# Altium PCB IvcBoard.PcbDoc (part 3 of 3)
Units mil, origin at the board's own origin, x right, y up, seen from the top; angles counter-clockwise.
Board outline 2900 x 5000 mil, 4 copper layers (Top Layer, GND 3, GND 2, Bottom Layer), stack 53.912 mil thick; 217 components, 141 nets, 662 pads, 224 vias.
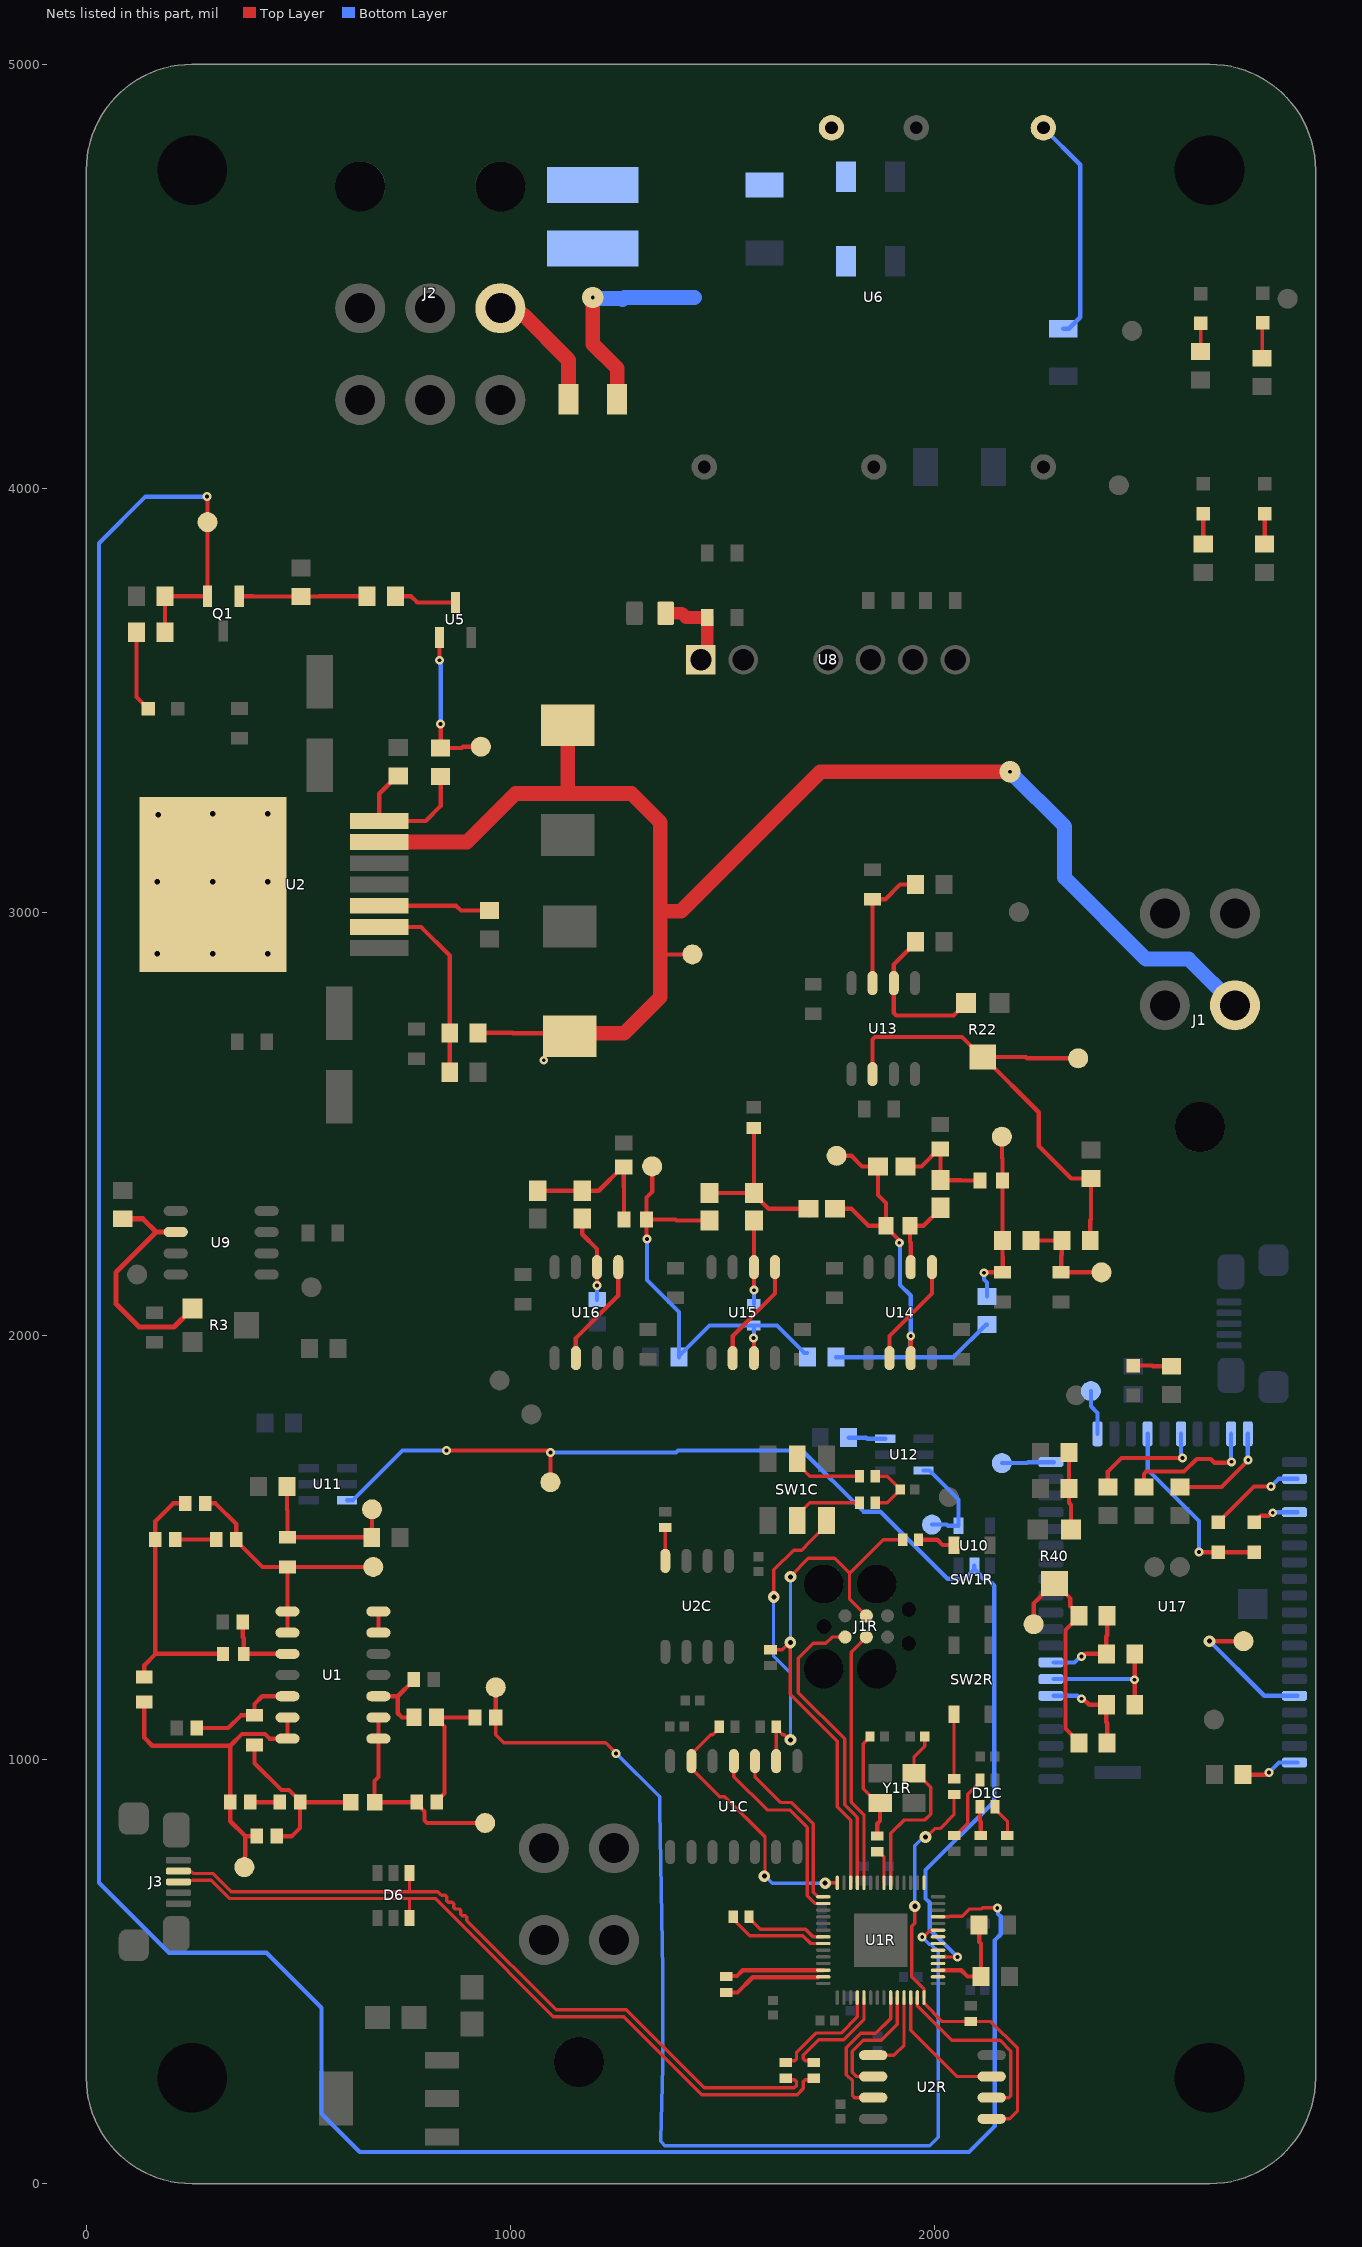
[diagram p5: the nets of this part, all layers, seen from the top]

## Via types
v1: diameter 21, hole 9, Top Layer to Bottom Layer, tented both sides, 102 vias
v2: diameter 20, hole 8, Top Layer to Bottom Layer, tented both sides, 41 vias
v3: diameter 27.56, hole 11.81, Top Layer to Bottom Layer, tented both sides, 34 vias
v4: diameter 30, hole 12, Top Layer to Bottom Layer, tented both sides, 11 vias
v5: diameter 45.28, hole 27.56, Top Layer to Bottom Layer, tented both sides, 10 vias
v6: diameter 31.5, hole 15.75, Top Layer to Bottom Layer, tented both sides, 9 vias
v7: diameter 50, hole 13, Top Layer to Bottom Layer, 9 vias
v8: diameter 50, hole 9, Top Layer to Bottom Layer, tented both sides, 7 vias
v9: diameter 31.5/31.5/31.5/31.5 (per signal layer), hole 15.75, Top Layer to Bottom Layer, tented both sides, 1 vias

## Nets (pads, with @x,y where several pads share a name; then routed paths per layer and width w, separated by ;. In a path a pad name is that pad's centre, name@x,y a point inside that pad or via, vN(x,y) a via of type N, cw(c..) or ccw(c..) an arc to the next point about the centre after c; other vN are vias at no path point) (continued)
MOSI_RP2CAN: U1C.11 U1R.30 | length 466.1
  Top Layer w7.87: U1C.11@1527.56,996.85 1527.56,960.44 1606.31,881.69 1659.96,881.69 1701.18,840.48 1701.18,678.91 1718.87,661.22 U1R.30@1738.68,661.22
nCS_RP2CAN: R4C.2 U1C.13 U1R.28 | length 642
  Top Layer w7.87: R4C.2@1493.11,1078.54 1493.11,1074.61 1477.5,1059 1472.98,1059 1427.56,1013.58 1427.56,980.12 1494.75,912.93 1506.45,912.93 1601.18,818.2 1601.18,726.97 v3(1599.63,725.41) ; v3(1743,709) 1743.94,709.94 U1R.28@1771.65,709.94
  Bottom Layer w7.87: v3(1599.63,725.41) 1601.92,725.41 1618.87,708.46 1742.46,708.46 v3(1743,709)
NetC1_1: C1.1 R5.2 R6.1 | length 305.7
  Top Layer w10: C1.1@826.62,900 826.62,902.95 845,921.33 845,1078.62 826.57,1097.05 R6.1@826.57,1100 R5.2@917,1100
NetC1_2: C1.2 R1.2 TP1.TP U1.1 U1.2 | length 497.3
  Top Layer w10: U1.2@689.28,1100 U1.1@689.28,1050 689.28,959.28 680.17,950.17 R1.2@680.17,900 776.43,900 798,878.43 798,856.86 803.86,851 TP1.TP@940.81,851
NetC2_1: C2.1 C3.1 R4.1 TP2.TP U1.13 U1.14 | length 812.7
  Top Layer w10: R4.1@137,1136.47 137,1052 155.73,1033.27 339.76,1033.27 ; TP2.TP@373,759 373,770.62 375,772.62 375,820 ; C2.1@402,820 375,820 ; U1.13@474.72,1100 U1.14@474.72,1050 432.56,1050 421.56,1061 367.49,1061 339.76,1033.27 ; 339.76,1033.27 C3.1@339.76,900 339.76,855.24 375,820
NetC2_2: C2.2 C4.2 R1.1 R7.1 | length 433.4
  Top Layer w10: R7.1@397,1035 397,992 460.28,928.72 478.48,928.72 494.48,912.72 504.24,902.95 C4.2@504.24,900 ; C2.2@449.24,820 485,820 504.24,839.24 C4.2@504.24,900 ; R1.1@623.83,900 C4.2@504.24,900
NetC2C_2: C2C.2 R2C.2 R3C.2 | length 144.3
  Top Layer w7.87: R2C.2@1861.22,1606.1 1889.17,1606.1 1919.88,1636.81 C2C.2@1919.88,1637.6 1919.88,1638.39 1889.17,1669.09 R3C.2@1861.22,1669.09
NetC2R_1: C2R.1 R1R.2 Y1R.3 | length 263.4
  Top Layer w8: C2R.1@1849.02,1054.92 1849.02,1054.13 1833.32,1038.44 1833.32,931.83 1866.85,898.31 Y1R.3@1872.76,898.31
  Top Layer w10: R1R.2@1866.14,820.59 1866.14,849.14 1872.76,855.76 Y1R.3@1872.76,898.31
NetC3_2: C3.2 C4.1 | length 70
  Top Layer w10: C3.2@387,900 C4.1@457,900
NetC5_1: C5.1 R6.2 U1.3 | length 183.6
  Top Layer w10: U1.3@689.28,1150 734.95,1150 ; C5.1@772,1190 772,1187.05 734.95,1150 ; R6.2@773.43,1100 745,1100 734.95,1110.05 734.95,1150
NetC6_1: C6.1 R7.2 U1.12 | length 261
  Top Layer w10: C6.1@260.62,1075 335,1075 365,1105 R7.2@397,1105 397,1132 415,1150 U1.12@474.72,1150
NetC7_1: C7.1 R8.1 U1.10 | length 179.1
  Top Layer w10: C7.1@369.24,1325 369.24,1289.76 371.61,1287.39 R8.1@371.61,1250 U1.10@474.72,1250
NetC10_1: C10.1 C11.1 C13.2 TP6.TP U1.8 U1.9 | length 627.5
  Top Layer w10: C10.1@280.23,1605.09 304.91,1605.09 353.85,1556.15 C11.1@353.85,1520.09 C11.1@355,1521.24 ; C11.1@358,1512.99 415.85,1455.14 ; 416,1455 C13.2@475,1455 475,1381.57 474.72,1381.28 U1.8@474.72,1350 U1.9@474.72,1300 ; C13.2@477,1455 TP6.TP@677,1455
NetC10_2: C10.2 C12.2 R4.2 R8.2 | length 623.8
  Top Layer w10: R4.2@137,1195.53 137,1223 163.5,1249.5 ; 162.98,1250.02 C12.2@162.98,1520.09 162.98,1562.98 205.09,1605.09 C10.2@232.98,1605.09 ; 164,1250 R8.2@322.39,1250
NetC11_2: C11.2 C12.1 | length 96.4
  Top Layer w10: C12.1@210.23,1520.09 C11.2@306.61,1520.09
NetC13_1: C13.1 R12.1 SB1.2 TP7.TP | length 385.3
  Top Layer w10: SB1.2@473.5,1645 473.5,1589.5 475,1588 C13.1@475,1525 R12.1@673.5,1525 673.5,1547.5 674,1548 TP7.TP@674,1591
NetC25_1: C25.1 R24.1 U13.3 | length 312.2
  Top Layer w10: U13.3@1855,2832.28 C25.1@1855,3030 1885,3030 1920,3065 R24.1@1955,3065
NetC27_1: C27.1 C33.1 R31.2 R33.2 | length 260.8
  Top Layer w10: C27.1@1932.51,2400 1970.59,2400 2012.05,2441.46 R33.2@2015,2441.46 ; R33.2@2015,2435 C33.1@2015,2367.51 2062.49,2367.51 2063,2367 R31.2@2108.43,2367
NetC27_2: C27.2 R25.2 R30.1 SB9.1 SB10.2 TP25.TP U14.7 | length 1159.6
  Top Layer w10: R30.1@1766.54,2300 1805,2300 1845,2260 R25.2@1886.46,2260 ; TP25.TP@1770,2425 1805,2425 1830,2400 C27.2@1867.49,2400 1867.49,2332.51 1886.46,2313.54 R25.2@1886.46,2260 ; v1(1918.09,2219.91) 1915.99,2222.02 1915.99,2227.52 1886.46,2257.05 R25.2@1886.46,2260 ; U14.7@1945,1955 v1(1945,2000)
  Bottom Layer w10: SB10.2@1768.5,1950 1945,1950 ; v1(1918.09,2219.91) 1919.5,2218.5 1919.5,2120.5 1945,2095 v1(1945,2000) 1945,1950 ; SB9.1@2125,2026.5 2122.5,2026.5 2046,1950 1945,1950
NetC28_1: C28.1 C34.1 R30.2 R35.2 | length 447.8
  Top Layer w10: C28.1@1470,2337.51 C34.1@1575,2337.51 ; R35.2@1575,2490.77 C34.1@1575,2337.51 ; R30.2@1685.55,2290 R30.2@1705,2290 ; R30.2@1687.7,2302.3 R30.2@1705,2285 ; R30.2@1703.46,2300 1609.79,2300 1575,2334.79 C34.1@1575,2337.51
NetC28_2: C28.2 R26.2 R32.1 SB10.1 SB11.2 TP26.TP U15.7 | length 1071.6
  Top Layer w10: v1@1320,2230 1321.57,2231.57 R32.1@1321.57,2275 ; TP26.TP@1335,2400 1335,2340 1321.57,2326.57 R32.1@1321.57,2275 ; C28.2@1470,2272.49 1392.51,2272.49 1390,2275 R32.1@1321.57,2275 ; U15.7@1575,1947.72 v1@1575,1995
  Bottom Layer w10: v1(1323,2229) 1323,2132 1398.5,2056.5 SB11.2@1398.5,1950 ; SB11.2@1398.5,1952.5 1470.41,2024.41 R26.2@1575,2024.41 ; v1@1575,1994 R26.2@1575,2024.41 ; SB10.1@1700,1960 1694,1960 1629.59,2024.41 R26.2@1575,2024.41
  other v1: 1574,1995
NetC29_1: C29.1 C35.1 R32.2 R34.2 | length 329.8
  Top Layer w10: C29.1@1085,2342.51 C35.1@1170,2342.51 1209.1,2342.51 1265.05,2398.46 R34.2@1268,2398.46 1268,2352 1268.43,2351.57 R32.2@1268.43,2275
NetC33_2: C33.2 R25.1 U14.2 | length 189
  Top Layer w10: U14.2@1945,2162.28 1945,2220 1943.54,2221.46 R25.1@1943.54,2260 1975.24,2260 2015,2299.76 C33.2@2015,2302.49
NetC34_2: C34.2 R26.1 U15.2 | length 195.3
  Top Layer w10: v1@1574,2109 1575,2110 U15.2@1575,2162.28 C34.2@1575,2272.49
  Bottom Layer w10: R26.1@1575,2075.59 v1@1575,2107
  other v1: 1575,2108
NetC35_2: C35.2 R27.1 U16.2 | length 204.4
  Top Layer w10: C35.2@1170,2277.49 1170,2240 1205,2205 U16.2@1205,2162.28 v1(1205,2119)
  Bottom Layer w10: R27.1@1205,2085.54 v1@1205,2117
NetC36_1: C36.1 R28.1 R29.2 TP19.TP | length 243.6
  Top Layer w10: R29.2@2228.5,2225 R28.1@2301.5,2225 2301.5,2191.5 2300,2190 C36.1@2300,2150 TP19.TP@2395,2150
NetC37_1: C37.1 R29.1 R31.1 SB9.2 TP20.TP | length 419.1
  Top Layer w10: v1@2120,2150 C37.1@2160,2150 ; TP20.TP@2160,2470 2160,2420 2161.57,2418.43 2161.57,2247.57 2161.5,2247.5 R29.1@2161.5,2225 2161.5,2187.5 2162,2187 C37.1@2162,2150
  Bottom Layer w10: v1@2120,2148 2118.03,2146.03 2118.03,2132.97 2125,2126 SB9.2@2125,2093.5
  other v1: 2118,2149
NetC41_1: C41.1 F1.2 L1.1 | length 510
  Top Layer w10: v8@1195,4445 v8@1200,4450
  Top Layer w35: v8@1195,4445 1195,4340 1252.48,4282.52 F1.2@1252.48,4210
  Bottom Layer w35: v8(1195,4450) 1197.87,4447.13 1262.87,4447.13 1265,4445 1270,4450 1435,4450
NetC42_1: C42.1 C43.1 L1.2 U6.1
NetC45_1: C45.1 L3.2 U8.1 | length 208.5
  Top Layer w30: L3.2@1366.81,3705 1405,3705 1415,3695 C45.1@1465,3695 1465,3610 U8.1@1450,3595
NetD1_1: D1.1 R15.2 | length 191.4
  Top Layer w10: R15.2@118.5,3660 118.5,3507.5 D1.1@146,3480
NetD1C_1: D1C.1 R5C.2 | length 80.1
  Top Layer w7.87: D1C.1@2143.7,889.57 2143.7,884.65 2173.23,855.12 R5C.2@2173.23,821.65
NetD1C_2: D1C.2 R7C.2 | length 68.7
  Top Layer w10: D1C.2@2108.27,889.57 2108.27,855.73 2110.24,853.76 R7C.2@2110.24,821.65
NetD1C_3: D1C.3 R8C.2 | length 158.5
  Top Layer w7.87: R8C.2@2047.24,821.65 2051.18,821.65 2079.72,850.2 2079.72,919.09 2108.27,947.64 D1C.3@2108.27,952.56
NetD2_1: D2.1 R18.1 | length 71
  Top Layer w8: R18.1@2629,4318 R18.1@2629,4322.5 D2.1@2629,4389
NetD3_1: D3.1 R20.1 | length 67.1
  Top Layer w10: R20.1@2630,3875 2635,3880 D3.1@2635,3940
NetD4_2: D4.2 R17.1 | length 69
  Top Layer w8: R17.1@2774,4308 D4.2@2774,4377
NetD5_2: D5.2 R19.1 | length 65
  Top Layer w10: R19.1@2780,3875 D5.2@2780,3940
NetD7_2: D7.2 R36.1 | length 90.6
  Top Layer w10: D7.2@2470,1930 2515,1930 2516.5,1928.5 R36.1@2560,1928.5
NetD8_1: D8.1 D9.1 U17.24 | length 459.4
  Top Layer w10: v1(2625,1490) D8.1@2670,1490 D9.1@2755,1490
  Bottom Layer w10: U17.24@2503.87,1769.21 2503.87,1684.57 2625,1563.44 v1(2625,1490)
NetD8_2: D8.2 U17.32 | length 230
  Top Layer w10: D8.2@2670,1560 2755,1645 v1(2795,1645)
  Bottom Layer w10: v1(2795,1645) 2812.91,1662.91 U17.32@2857.32,1662.91
NetD9_2: D9.2 U17.34 | length 112.3
  Top Layer w10: D9.2@2755,1560 2771,1576 2789.02,1576 2796.02,1583 v1(2799,1583)
  Bottom Layer w10: v1(2799,1583) 2800.17,1584.17 U17.34@2857.32,1584.17
NetDNP1_1: DNP1.1 U1R.35 | length 198.4
  Top Layer w8: DNP1.1@1560,630 1589.76,600.24 1696.78,600.24 1714.47,582.54 1738.62,582.54 U1R.35@1738.68,582.48
NetDNP1_2: DNP1.2 U1R.36 | length 237.8
  Top Layer w8: DNP1.2@1525,625 1564.76,585.24 1690.56,585.24 1709.07,566.73 U1R.36@1738.68,566.73
NetDNP2_1: DNP2.1 U1R.40 | length 229.4
  Top Layer w10: DNP2.1@1515,490 1535,490 1548.74,503.74 U1R.40@1738.68,503.74
NetDNP2_2: DNP2.2 U1R.41 | length 231.3
  Top Layer w10: DNP2.2@1510,451.3 1536.3,451.3 1572.18,487.18 U1R.41@1726.46,487.18
NetQ1_1: Q1.1 R13.2 R14.1 | length 301.9
  Top Layer w10: Q1.1@361,3745 393,3745 393.5,3744.5 549.5,3744.5 550,3745 R14.1@662.5,3745
NetR2_1: R2.1 R3.1 U9.2 | length 567.3
  Top Layer w12: R2.1@86,2276.5 133.5,2276.5 165,2245 ; U9.2@211,2245 197.95,2245 165,2245 ; R3.1@250.13,2064.37 206.76,2021 125,2021 70,2076 70,2150 165,2245
NetR2C_1: R2C.1 SW1C.2 | length 170.8
  Top Layer w7.87: SW1C.2@1677.17,1564.76 1677.17,1576.57 1706.69,1606.1 1722.17,1606.1 1722.26,1606.2 1769.86,1606.2 1769.96,1606.1 R2C.1@1823.82,1606.1
NetR3C_1: R3C.1 SW1C.5 | length 170.8
  Top Layer w7.87: SW1C.5@1677.17,1710.43 1677.17,1698.62 1706.69,1669.09 1722.17,1669.09 1722.26,1669 1769.86,1669 1769.96,1669.09 R3C.1@1823.82,1669.09
NetR6C_1: R6C.1 U2C.8 | length 78.7
  Top Layer w7.87: U2C.8@1365.94,1469.29 R6C.1@1365.94,1548.03
NetR6R_1: R6R.1 SW1R.A2 | length 105.4
  Top Layer w7.87: SW1R.A2@2038.39,1519.49 2047.24,1510.63 SW1R.A2@2047.24,1506.69
  Top Layer w10: R6R.1@1963.58,1519.49 2007.51,1519.49 2020.31,1506.69 SW1R.A2@2047.24,1506.69
NetR7R_1: R7R.1 SW2R.A1 | length 151.6
  Top Layer w7.87: R7R.1@2047.24,955.51 SW2R.A1@2047.24,1107.09
NetR9_1: R9.1 R10.2 U2.2 | length 421
  Top Layer w10: U2.2@740,2965 790,2965 857.5,2897.5 R10.2@857.5,2715 R9.1@857.5,2622
NetR14_2: R14.2 U5.3 | length 147.7
  Top Layer w10: R14.2@729.5,3745 766,3745 781,3730 U5.3@871,3730
NetR21_1: R21.1 SB5.2 U1R.3 | length 229.9
  Top Layer w10: U1R.3@2009.35,503.74 2064.26,503.74 2079,489 SB5.2@2110.5,489 2110.5,566.5 2106.5,570.5 R21.1@2106.5,610
NetR22_2: R22.2 R28.2 SB8.1 TP18.TP U13.6 | length 1138.6
  Top Layer w10: U13.6@1855,2617.72 1855,2699.14 1860.86,2705 2065.94,2705 2113.03,2657.91 2217.09,2657.91 2220,2655 TP18.TP@2340,2655 ; R22.2@2116.97,2657.91 2247,2527.88 2247,2448 2323.5,2371.5 SB8.1@2370,2371.5 ; R28.2@2368.5,2225 2368.5,2273.5 2370,2275 SB8.1@2370,2355
NetR22_3: R22.3 R23.1 U13.2 | length 374.9
  Top Layer w10: R23.1@1956.5,2930 1956.5,2927.5 1905,2876 U13.2@1905,2832.28 1905,2761.86 1910.86,2756 2045.76,2756 R22.3@2075.63,2785.87
NetR37_1: R37.1 R38.1 U17.6 | length 218
  Top Layer w10: v1@2350,1140 2351.9,1141.9 2354.1,1141.9 2366,1130 R38.1@2406.5,1130 2406.5,1088.5 2408.5,1086.5 R37.1@2408.5,1040
  Bottom Layer w10: U17.6@2282.52,1151.1 2337.92,1151.1 2344.02,1145 v1@2345,1145
  other v1: 2348,1144
NetR37_2: R37.2 R40.2 R41.2 TP28.TP | length 544.3
  Top Layer w10: TP28.TP@2235,1320 2235,1368.88 2247.48,1381.37 2282.03,1415.91 2285.97,1415.91 2321.5,1380.38 2321.5,1362.5 2341.5,1342.5 2341.5,1337.5 2326.5,1322.5 2310,1306 2310,1074 2341.5,1042.5 R37.2@2341.5,1040
NetR38_2: R38.2 R39.2 U17.7 | length 308.2
  Top Layer w10: R38.2@2473.5,1130 2473.5,1188.5 v1@2475,1190 ; v1@2473.5,1193.5 R39.2@2473.5,1250
  Bottom Layer w10: U17.7@2282.52,1190.47 2471.53,1190.47 v1(2473,1189)
NetR39_1: R39.1 R41.1 U17.8 | length 218.4
  Top Layer w10: v1@2350,1243.02 2356.98,1250 R39.1@2406.5,1250 2406.5,1291.5 2408.5,1293.5 R41.1@2408.5,1340
  Bottom Layer w10: U17.8@2282.52,1229.84 2331.05,1229.84 2343.01,1241.8 2343.2,1241.8 v1@2345,1240
  other v1: 2348,1244
NetR40_1: R40.1 R42.1 SB12.1 | length 183.2
  Top Layer w10: SB12.1@2318.5,1725 2318.5,1606.5 2323.37,1601.63 R40.1@2323.37,1543.87
NetSB2_1: SB2.1 U2.3 | length 264.8
  Top Layer w10: U2.3@691,3015 872.5,3015 884,3003.5 SB2.1@951,3003.5
NetSB3_1: SB3.1 SB4.1 U2.7 | length 356.1
  Top Layer w10: SB3.1@736,3321.5 733.5,3321.5 691,3279 U2.7@691,3215 801,3215 836,3250 SB4.1@836,3320
NetSB4_2: SB4.2 TP9.TP U5.1 | length 358.7
  Top Layer w10: v1(833,3594) 833.5,3594.5 U5.1@833.5,3648 ; v1(836,3444) SB4.2@836,3387 886,3387 889,3390 TP9.TP@931,3390
  Bottom Layer w10: v1(833,3594) 834.91,3592.09 834.91,3585.02 836,3583.93 v1(836,3444)
NetSB6_2: SB6.2 U12.6 | length 87.6
  Bottom Layer w10: SB6.2@1798.5,1760 1840,1760 1842.6,1757.4 U12.6@1885,1757.4
NetSB13_2: SB13.2 U17.49 | length 140.7
  Top Layer w10: SB13.2@2728.5,965 2782.02,965 2787.02,970 v1(2790,970)
  Bottom Layer w10: v1(2790,970) 2813.62,993.62 U17.49@2857.32,993.62
NetSB14_1: SB14.1 U17.26 | length 284
  Top Layer w10: SB14.1@2410,1643.5 2410,1680 2442.2,1712.2 v1(2585.8,1712.2)
  Bottom Layer w10: U17.26@2582.61,1769.21 2582.61,1718.37 2585.8,1715.18 v1(2585.8,1712.2)
NetSB15_1: SB15.1 U6.6 | length 534
  Bottom Layer w10: U6.6@2258,4850 2345,4763 2345,4403.31 2317.87,4376.18 SB15.1@2305,4376.18
NetSB16_1: SB16.1 U17.30 | length 250.5
  Top Layer w10: SB16.1@2580,1643.5 2678.5,1643.5 2741,1706 v1(2741,1707)
  Bottom Layer w10: U17.30@2740.09,1769.21 2740.09,1707.91 v1(2741,1707)
NetSB18_1: SB18.1 U17.29 | length 323.7
  Top Layer w10: SB18.1@2495,1643.5 2495,1674.14 2500.86,1680 2589.66,1680 2619.66,1710 2652.84,1710 2661.84,1701 2699.94,1701 v1(2701.97,1703.03)
  Bottom Layer w10: U17.29@2700.72,1769.21 2700.72,1704.28 v1(2701.97,1703.03)
NetTP14_TP: TP14.TP U10.4 U12.3 | length 236.5
  Bottom Layer w10: U12.3@1975,1682.6 1989,1682.6 2057.6,1614 U10.4@2057.6,1552.24 2032.76,1552.24 2030,1555 TP14.TP@1995,1555
NetTP21_TP: TP21.TP U17.20 | length 123.5
  Bottom Layer w10: TP21.TP@2160,1700 2220,1700 2222.28,1702.28 U17.20@2282.52,1702.28
NetTP22_TP: TP22.TP U17.21 | length 107.3
  Bottom Layer w10: TP22.TP@2370,1870 2370,1834 2385.76,1818.24 U17.21@2385.76,1769.21
NetTP23_TP: TP23.TP U17.45 | length 340.7
  Top Layer w10: v3(2650,1280) TP23.TP@2730,1280
  Bottom Layer w10: v3(2650,1280) 2778.9,1151.1 U17.45@2857.32,1151.1
NetU1_6: U1.6 U1.7 | length 50
  Top Layer w10: U1.6@689.28,1300 U1.7@689.28,1350
NetU1R_2: U1R.2
NetU1R_4: U1R.4
NetU1R_6: U1R.6
NetU1R_7: U1R.7
NetU1R_8: U1R.8
NetU1R_15: U1R.15
NetU14_1: U14.1 U14.6 | length 256
  Top Layer w10: U14.6@1895,1947.72 1895,2000 1995,2100 U14.1@1995,2162.28
NetU15_1: U15.1 U15.6 | length 256
  Top Layer w10: U15.6@1525,1947.72 1525,2000 1625,2100 U15.1@1625,2162.28
NetU16_1: U16.1 U16.6 | length 256
  Top Layer w10: U16.6@1155,1947.72 1155,1995 1255,2095 U16.1@1255,2162.28
OutputSelect: TP16.TP U1R.5 U10.2 U11.3 | length 2820.8
  Top Layer w8: U1R.5@2009.35,535.24 2026.57,535.24 ; 2026.81,535 v1@2055,535
  Top Layer w10: v1(850.13,1729.86) v1@1087.17,1729.86 ; TP16.TP@1095,1655 v1(1095,1725) ; 2026.57,535.24 2026.81,535
  Bottom Layer w10: U11.3@615,1612.6 629,1612.6 746.26,1729.86 v1(850.13,1729.86) ; v1(1095,1725) 1390.99,1725 1395.99,1730 1689,1730 1833.46,1585.54 1873.04,1585.54 2031.5,1427.07 2073.97,1427.07 2081.04,1434.14 2081.04,1435.92 U10.2@2095,1449.88 ; v1(2055.13,534.86) 1990,599.99 1990,663.05 1980,673.05 1980,740 2142,902 2142,1410.76 2125.76,1427 2116.11,1427 2109.59,1433.51 2109.59,1435.29 2106.81,1438.07 U10.2@2095,1449.88 ; U10.2@2095,1457.76 U10.2@2095,1449.88
QSPI_SCLK_RP2040: U1R.52 U2R.6 | length 294.7
  Top Layer w7.87: U2R.6@1852.36,253.15 1816.85,253.15 1807.09,262.91 1807.09,312.93 1832.54,338.39 1875.2,338.39 1913.39,376.57 U1R.52@1913.39,439.27
QSPI_SD0_RP2040: U1R.53 U2R.5 | length 194.8
  Top Layer w7.87: U2R.5@1856.36,303.15 1905.15,303.15 1929.13,327.13 U1R.53@1929.13,439.27
QSPI_SD1_RP2040: U1R.55 U2R.2 | length 436.8
  Top Layer w7.87: U1R.55@1960.63,439.27 1960.63,419.46 2041.71,338.39 2155.71,338.39 2181.16,312.93 2181.16,243.37 2181.1,243.31 2181.1,207.76 2176.49,203.15 U2R.2@2135.88,203.15
QSPI_SD2_RP2040: U1R.54 U2R.3 | length 313.4
  Top Layer w7.87: U1R.54@1944.88,439.27 1944.88,362.01 2053.74,253.15 U2R.3@2135.88,253.15
QSPI_SD3_RP2040: U1R.51 U2R.7 | length 348.4
  Top Layer w7.87: U2R.7@1852.36,203.15 1812.33,203.15 1807.72,207.76 1807.72,242.66 1793.21,257.17 1793.21,321.33 1826.51,354.63 1862.47,354.63 1897.64,389.79 U1R.51@1897.64,439.27
QSPI_SS_RP2040: R5R.2 R7R.2 U1R.56 U2R.1 | length 1028.1
  Top Layer w7.87: v3(1954.49,654.6) 1954.49,614.04 1947.52,607.08 1947.52,487.94 1976.38,459.08 U1R.56@1976.38,439.27 ; U1R.56@1976.38,425.98 2019.69,382.68 R5R.2@2086.61,382.68 2133.69,382.68 2196.91,319.46 2196.91,171.91 2178.15,153.15 U2R.1@2131.89,153.15 ; v3(1980,818) 1981.85,818 2001.81,837.95 2014.04,837.95 2047.24,871.16 R7R.2@2047.24,918.11
  Bottom Layer w7.87: v3(1954.49,654.6) 1954.49,797.16 1975.33,818 v3(1980,818)
Rp2040Sig: R5.1 TP3.TP U1R.9 | length 2573.6
  Top Layer w8: R5.1@966.21,1100 966.21,1058.79 985,1040 1225,1040 v1(1250,1015) ; v1(1971.96,581.96) 1974.42,581.96 1990.69,598.23 U1R.9@2009.35,598.23
  Top Layer w10: TP3.TP@966,1171 966,1135 966.21,1134.79 R5.1@966.21,1100
  Bottom Layer w8: v1(1250,1015) 1352.5,912.5 1352.5,884.32 1360,501.89 1360,276.83 1360,276.72 1355.16,103.26 1355.16,99.84 1357.5,97.5 1365,90 1990.31,90 2010,109.69 2010,548 1992.74,565.26 1988.66,565.26 v1(1971.96,581.96)
RUN_RP2040: J1R.4 R4R.2 R6R.2 U1R.26 | length 1282.4
  Top Layer w7.87: R4R.2@1614.17,1259.65 1642.16,1259.65 1659.52,1277 v3(1661,1277) 1661,1154.52 1771.65,1043.87 1771.65,888.95 1803.15,857.46 U1R.26@1803.15,709.94 ; v3(1661.42,1431.55) 1661.42,1432.87 1703.74,1475.2 1765.19,1475.2 1800.59,1439.8 ; J1R.4@1840.16,1339.76 1800.59,1379.33 1800.59,1439.8 ; R6R.2@1926.18,1519.49 1880.29,1519.49 1800.59,1439.8
  Bottom Layer w7.87: v3(1661,1277) 1661.21,1277.21 1661.21,1431.34 v3(1661.42,1431.55)
SCK_RP2CAN: U1C.10 U1R.29 | length 409.6
  Top Layer w7.87: U1C.10@1577.56,996.85 1577.56,960.44 1638.77,899.23 1664.7,899.23 1715.28,848.64 1715.28,687.08 1725.39,676.97 U1R.29@1738.68,676.97
SWCLK_RP2040: J1R.3 U1R.24 | length 606.9
  Top Layer w7.87: U1R.24@1834.65,709.94 1834.65,870.5 1804.72,900.43 1804.72,1254.33 J1R.3@1840.16,1289.76
SWDIO_RP2040: J1R.1 U1R.25 | length 718.6
  Top Layer w7.87: J1R.1@1790.16,1289.76 1759.62,1289.76 1745.05,1275.2 1715.12,1275.2 1679.72,1239.8 1679.72,1158.55 1788.97,1049.3 1788.97,893.9 1818.9,863.98 U1R.25@1818.9,709.94
TempShtdwnState: Q1.2 R15.1 R16.1 TP10.TP U1R.11 | length 7096.7
  Top Layer w8: U1R.11@2009.35,629.72 2036.44,629.72 2037.49,630.78 2066.44,630.78 2083.84,648.18 2112.29,648.18 2114.83,650.72 v1(2149.28,650.72)
  Top Layer w10: R15.1@185.5,3660 185.5,3699.5 186,3700 R16.1@186,3745 Q1.2@286,3745 TP10.TP@286,3920 286,3979 v1(285,3980)
  Bottom Layer w10: v1@280,3980 140,3980 30,3870 30,710 195,545 425,545 555,415 555,165 645,75 2082.37,75 2143.38,136.01 2143.38,574.59 2157.26,588.48 2157.26,630.34 2151.11,636.49 2151.11,648.89 v1(2149.28,650.72)
TERM_DET_RP2CAN: R1C.2 SW1C.3 U1C.9 | length 724.1
  Top Layer w7.87: v3(1622,1384) 1622,1448.07 1668.63,1494.69 1687.69,1494.69 1706.98,1513.98 1707.09,1513.98 1746.06,1552.95 SW1C.3@1746.06,1564.76 ; U1C.9@1627.56,996.85 R1C.2@1627.56,1074.61 ; R1C.2@1627.56,1078.54 R1C.2@1627.56,1074.61 ; v3(1661.42,1047.05) 1658.92,1047.05 1646.96,1059 1643.17,1059 R1C.2@1627.56,1074.61
  Bottom Layer w7.87: v3(1622,1384) 1621.42,1383.42 1621.42,1244.53 1661.42,1204.53 v3(1661.42,1047.05)
TH: U2.8 | length 120.2
  Top Layer w10: U2.8@214.27,3150 U2.8@299.27,3065
  other v7: 168,2902 298,2902 428,2902 168,3072 298,3072 428,3072 170,3230 298,3232 428,3232
TransducerOut: J1.1 R10.1 TP8.TP U2.6 U3.1 U4.2 | length 3640.5
  Top Layer w10: R10.1@924.5,2715 1006,2715 1007,2714 U4.2@1141,2714 ; 1354,2900 TP8.TP@1430,2900
  Top Layer w35: U2.6@691,3165 897.95,3165 1012.95,3280 1136,3280 ; U3.1@1136,3435 1136,3280 ; U4.2@1141,2714 1269,2714 1354,2799 1354,2900 1354,3002 ; v8(2179,3331) 1732,3331 1403,3002 1354,3002 ; 1136,3280 1286,3280 1354,3212 1354,3002
  Bottom Layer w10: J1.1@2708,2778 J1.1@2708,2782
  Bottom Layer w35: v8(2179,3331) 2308,3202 2308,3081 2500,2889 2601,2889 J1.1@2708,2782
  other v2: 1079.45,2650.61
USB_N: D6.1 J3.2 R3R.1 | length 1775.1
  Top Layer w8: J3.2@217.32,737.59 246.78,737.22 252.06,731.94 298.58,731.94 305.61,724.91 341.52,689 760,689 ; D6.1@762.4,733.15 762.4,691.4 760,689 ; R3R.1@1650.53,248.82 1654.42,244.92 1670.84,244.92 1675.53,240.23 1675.53,231.26 1670.26,225.99 1458.28,225.99 1274.27,410 1108.63,410 900.38,618.25 897.55,621.08 897.55,628.45 894.01,631.99 886.64,631.99 883.1,635.52 883.1,644.62 879.57,648.15 870.48,648.15 866.94,651.69 866.94,660.78 863.4,664.31 854.31,664.31 850.78,667.85 850.78,676.94 847.24,680.48 838.15,680.48 835.32,683.31 829.63,689 760,689
USB_P: D6.6 J3.3 R2R.1 | length 1781.4
  Top Layer w8: J3.3@217.32,712 250.78,715.94 294.79,715.94 337.72,673 760,673 ; D6.6@762.4,626.85 762.4,670.6 760,673 ; R2R.1@1716.54,248.82 1712.64,244.92 1696.22,244.92 1691.53,240.23 1691.53,224.64 1676.89,209.99 1451.65,209.99 1267.64,394 1102,394 889.06,606.94 823,673 760,673
USB_RP2040_N: R3R.2 U1R.46 | length 267.4
  Top Layer w7.87: R3R.2@1650.53,286.22 1654.25,289.94 1671.04,289.94 1675.66,294.55 1675.66,309.91 1721.3,355.55 1780.57,355.55 1818.9,393.87 U1R.46@1818.9,439.27
USB_RP2040_P: R2R.2 U1R.47 | length 267.4
  Top Layer w7.87: R2R.2@1716.54,286.22 1712.81,289.94 1696.02,289.94 1691.4,294.55 1691.4,303.38 1727.82,339.8 1787.1,339.8 1834.65,387.35 U1R.47@1834.65,439.27
V+: F1.1 J2.3 | length 303.9
  Top Layer w35: J2.3@976.71,4424.6 992.61,4408.7 1031.3,4408.7 1137.52,4302.48 F1.1@1137.52,4210
XIN_RP2040: C1R.1 U1R.20 Y1R.1 | length 443.1
  Top Layer w7.87: U1R.20@1897.64,709.94 1897.64,826.57 1929.13,858.07 1978.44,858.07 1992.13,871.76 1992.13,934.84 1958.66,968.31 Y1R.1@1952.76,968.31 1952.76,1007.58 1977.76,1032.58 C1R.1@1977.76,1054.92
XOUT_RP2040: R1R.1 U1R.21 | length 82.1
  Top Layer w7.87: R1R.1@1866.14,783.19 1870.08,783.19 1881.89,771.38 U1R.21@1881.89,709.94
pads on no net: D6.3 D6.4 J1. J1R.A J1R.B J1R.C J1R.D J1R.E J1R.F J1R.G J2. J2.6 J3.1 J3.4 J4.1 J4.4 J5. R3.3 R22.1 R40.3 SW1R.A1 SW2R.A2 U1.5 U1C.3 U1C.5 U1C.8 U8.3 U9.1 U9.5 U9.8 U10.1 U13.1 U13.5 U13.8 U17.1 U17.2 U17.3 U17.4 U17.5 U17.9 U17.10 U17.11 U17.12 U17.13 U17.14 U17.15 U17.17 U17.18 U17.19 U17.22 U17.25 U17.27 U17.28 U17.31 U17.33 U17.35 U17.38 U17.39 U17.40 U17.41 U17.42 U17.43 U17.44 U17.46 U17.47 U17.48

## Polygon pours and split planes (outlines as drawn)
-24 on Bottom Layer "-24_L04_P005" (solid, pour order 5): 2350,3985 2370,4005 2370,4220 2300,4290 1065,4290 465.91,3690.91 255.03,3686.03 31,3462 31,2039 114,1956 118,1960 292,1960 342,2010 342,2637.54 405.46,2701 809,2701 985,2877 985,3877.06 1227.94,4120 2060,4120 2105,4075 2105,4008.4 2129.37,3985
+24 on Bottom Layer "+24_L04_P003" (solid, remove dead copper, pour order 3): 1200,4090 995.49,3885.49 993.64,2824.58 838.99,2668.38 433.5,2670.5 381.34,2618.52 378,1990 451,1917 587,1917 1330.58,2660.58 1324.24,3744.24 1526,3946 1526,4090
NetC41_1 on Bottom Layer "NETC41_1_L04_P033" (solid, pour order 33): 1835,4580 1790,4625 1255,4625 1230,4600 1230,4385 1265,4350 1795,4350 1835,4390
NetC42_1 on Bottom Layer "NETC42_1_L04_P032" (solid, pour order 32): 1835,4890 1800,4925 1225,4925 1205,4905 1205,4695 1250,4650 1785,4650 1835,4700
GND on Bottom Layer "GND_L04_P031" (solid, pour order 31): 2345,4890 2310,4925 1910,4925 1865,4880 1865,4400 1915,4350 2330,4350 2345,4365
-5 on Bottom Layer "-5_L04_P014" (solid, pour order 14): 2026.5,3876.5 862.43,2712.43 862.43,2163.5 593.43,1894.5 207.43,1894.5 96.43,1783.5 96.43,1169.5 147.97,1117.95 1029.71,1116.79 1072.43,1159.5 1072.43,1771.5 1162.43,1861.5 1182.43,1841.5 2271.5,1841.5 2847.43,2417.43 2847.43,3876.5
+5 on Top Layer "+5_L01_P015" (solid, remove dead copper, pour order 15): 610,1170 445,1340 445,1370 445,2086 1734,3375 1734,3583.99 2021.14,3871.13 2777,3868.22 2897.19,3748.03 2898.61,1974.48 2714.14,1790 1409,1790 985,1366 985,1170
5V on Top Layer "5V_L01_P000" (solid, pour order 0): 732,4301 286,3855 286,3581 398,3581 537,3720 585,3672 1339.22,3671.72 1476,3672 1499,3695 1499,3795 1486,3808 1357,3808 864,4301
3v3 on Top Layer "3V3_RP2040" (solid, pour order 24): 1357.63,93.53 1357.63,1522.27 2277.63,1522.27 2277.63,93.53
3v3 on Top Layer "3V3_L01_P030" (solid, pour order 30): 665,490 739,416 739,305 789,255 1359,255 1382,232 1382,101 1287,6 552,6 523,35 523,457 556,490
GND on Top Layer "GND_L01_P011" (solid, pour order 11): 71.53,903.24 212.53,903.24 254.53,861.24 254.53,563.24 202.53,511.24 95.53,511.24 49.53,557.24 49.53,887.24
GND on GND 3 "GND_L02_P039" (solid, pour order 39): 0,2625 245,2380 1115,2380 1540,2805 1540,3275 1254.5,3560.5 1255.06,3783.74 1407.96,3940 2305,3945 2355,3995 2355,5075 2885.04,5075 2885.04,920 2220,920 2220,492.05 2220,0 0,0
GND on GND 3 "GND_L02_P040" (solid, pour order 40): 2270,5030 2395,5030 2395,4245 2265,4245 2265,4550
GND on GND 3 "GND_L02_P036" (solid, pour order 36): 2330,5000 20,5000 20,2660 260,2420 1100,2420 1505,2825 1505,3250 1230,3525 1230,3810 1385,3965 2285,3965 2330,4010
GND on GND 2 "GND_L03_P035" (solid, pour order 35): 2270,5030 2395,5030 2395,4245 2265,4245 2265,4550
GND on GND 2 "GND_L03_P026" (solid, pour order 26): 0,2625 245,2380 1115,2380 1540,2805 1540,3275 1254.5,3560.5 1255.06,3783.74 1407.96,3940 2300,3940 2355,3995 2355,5075 2885.04,5075 2885.04,920 2220,920 2220,492.05 2220,0 0,0
GND on GND 2 "GND_L03_P034" (solid, pour order 34): 2330,5000 20,5000 20,2660 260,2420 1100,2420 1505,2825 1505,3250 1230,3525 1230,3810 1385,3965 2285,3965 2330,4010

## Keep-outs
Keep-Out Layer:
  region: 250,0 cw(c250,250) 0,250 0,450 255,450 cw(c255,255) 450,255 450,0
  region: -0.67,4750.97 cw(c249.33,4750.97) 249.33,5000.97 499.33,5000.97 499.33,4750.97 cw(c249.33,4750.97) 249.33,4500.97 -0.67,4500.97
  region: 2903.89,247.13 cw(c2653.89,247.13) 2653.89,-2.87 2403.89,-2.87 2403.89,247.13 cw(c2653.89,247.13) 2653.89,497.13 2903.89,497.13
  region: 2651.75,5001.4 cw(c2651.75,4751.4) 2901.75,4751.4 2901.75,4501.4 2651.75,4501.4 cw(c2651.75,4751.4) 2401.75,4751.4 2401.75,5001.4
  lines w5: 0,3979 10.77,3968.23
  lines w10: -1.25,4750 cw(c250,4750) 250,5001.25 ; 0,4750 0,250 ccw(c250,250) 250,0 2650,0 ccw(c2643.75,256.25) 2900,250 2900,4750 ccw(c2650,4750) 2650,5000 250,5000

## Other copper
Top Layer:
  pour cut-out: 1738,1361 1738,1309 1786,1261 1906,1261 1921,1276 1921,1339 1893,1367 1891,1365 1740,1365
  pour cut-out: 1876.6,646.57 1926.6,696.57 1971.6,696.57 1971.6,606.57 1936.6,606.57
  pour cut-out: 1983.69,556.35 1983.47,556.57 1766.72,556.57 1766.72,503.96 1794.04,476.64 1866.65,476.64 1881.72,461.57 1981.72,461.57
  pour cut-out: 1360.83,986.57 1360.83,776.57 1365.83,771.57 1615.83,771.57 1615.83,911.57 1555.83,1001.57
  pour cut-out: 1996.51,854.39 1996.55,854.42 2016.94,854.42 2015.82,1055 2004.31,1066.51 1999.66,1066.51 1999.66,1030.95 1975.6,1006.89 1975.6,984.72 1990.62,969.7 1990.62,959.7
  pour cut-out: 1737.98,1357.15 1748.72,1353.1 1781.61,1353.1 1787.67,1359.15 1787.67,1389.15 1762.67,1389.15 1752.67,1379.15
Bottom Layer:
  rectangle net TH: 104,2832 477,3297

## Silkscreen, mask and mechanical layers (free items; w line width, h text height)
Top Overlay:
  lines w10: 430,1970 450,1990 ; 430,2010 450,1990 ; 530,3995.09 1100,3995 ; 767,3902 767,4085 ; 940,4085 942,3904 ; 1010,969.98 1290,969.94 ; 1158,878 1158,1060 ; 2385,3220 2860,3219.92 ; 2613,3128 2613,3310 ; 450,1990 450,2030 ; 450,1990 470,1970 450,1950 450,2030 ; 450,1990 470,2010 450,2030 ; 530,3895 1100,3895 1100,4085 530,4085 530,3895 ; 1010,875 1010,1065 1290,1065 1290,875 1010,875 ; 2385,3125 2860,3125 2863,3128 2863,3312 2860,3315 2385,3315 2385,3125 ; 2540,4133 2880,4133 2880,4562 2540,4562 2540,4133 ; 2555,3715 2880,3715 2880,4100 2555,4100 2555,3715
  text "STACK LINK" at 1105,4875 h30 r270
  text "+24V" at 2740,4370 h30 r90
  text "-24V" at 2590,4365 h30 r90
  text "GND" at 800,4060 h40 r180
  text "V+" at 985,4060 h40 r180
  text "CAN_L" at 555,4058.34 h40 r180
  text "5V" at 820,3965 h40 r180
  text "CAN_H" at 555,3963.34 h40 r180
  text "-5V" at 2600,3920 h30 r90
  text "+5V" at 2745,3920 h30 r90
  text "POWER" at 2075,3885 h30
  text "Trans. POWER" at 55,3335 h30
  text "Cool +-5V Box" at 1750,3330 h30
  text "GND" at 2445,3250 h40
  text "HYDRO" at 2645,3250 h40
  text "GND" at 2445,3155 h40
  text "TRANS" at 2640,3155 h40
  text "RECV. VOLUME" at 2015,2845 h30
  text "ACOUSTICS INTERCONNECT" at 2875,2385 h30 r90
  text "TRANSMISSION VOLUME" at 75,1855 h30
  text "TERM / ON" at 1565.83,1559.29 h30 r90
  text "1" at 2705,1475 h22
  text "2" at 2790,1475 h22
  text "BLUETOOTH VOLUME" at 2370,1385 h30
  text "RESET" at 2200.34,1355.02 h30 r90
  text "BOOT" at 2200.34,1133.8 h30 r90
  text "HYD" at 1030,995 h40
  text "-5" at 1185,995 h40
  text "Trans. LPF" at 525,965 h30
  text "GND" at 1030,905 h40
  text "+5" at 1185,905 h40
  text "RP2040" at 275,585 h40
  text "LIL'BOAT" at 2230,411 h30
Bottom Overlay:
  drawing of 163 lines, arcs and shapes, not listed
  text "BT MODULE" at 2575,2185 h40 r90
  text "'.ProjectTitle'" at 135,1015 h30 r270
  text "The Underwater Robotics Team" at 210,1010 h30 r270
  text "ECE 3906/4905 Team 19" at 290,1010 h30 r270
Bottom Solder:
  rectangle: 104,2832 477,3297